# Altium PCB Main-PCB-v1.0.PcbDoc (part 2 of 2)
Units mm, origin at the board's own origin, x right, y up, seen from the top; angles counter-clockwise.
Board outline 33.25 x 52.01 mm, 2 copper layers (Top Layer, Bottom Layer), stack 1.448 mm thick; 71 components, 60 nets, 257 pads, 0 vias.
Unrouted connection lines stored in the file: 158.
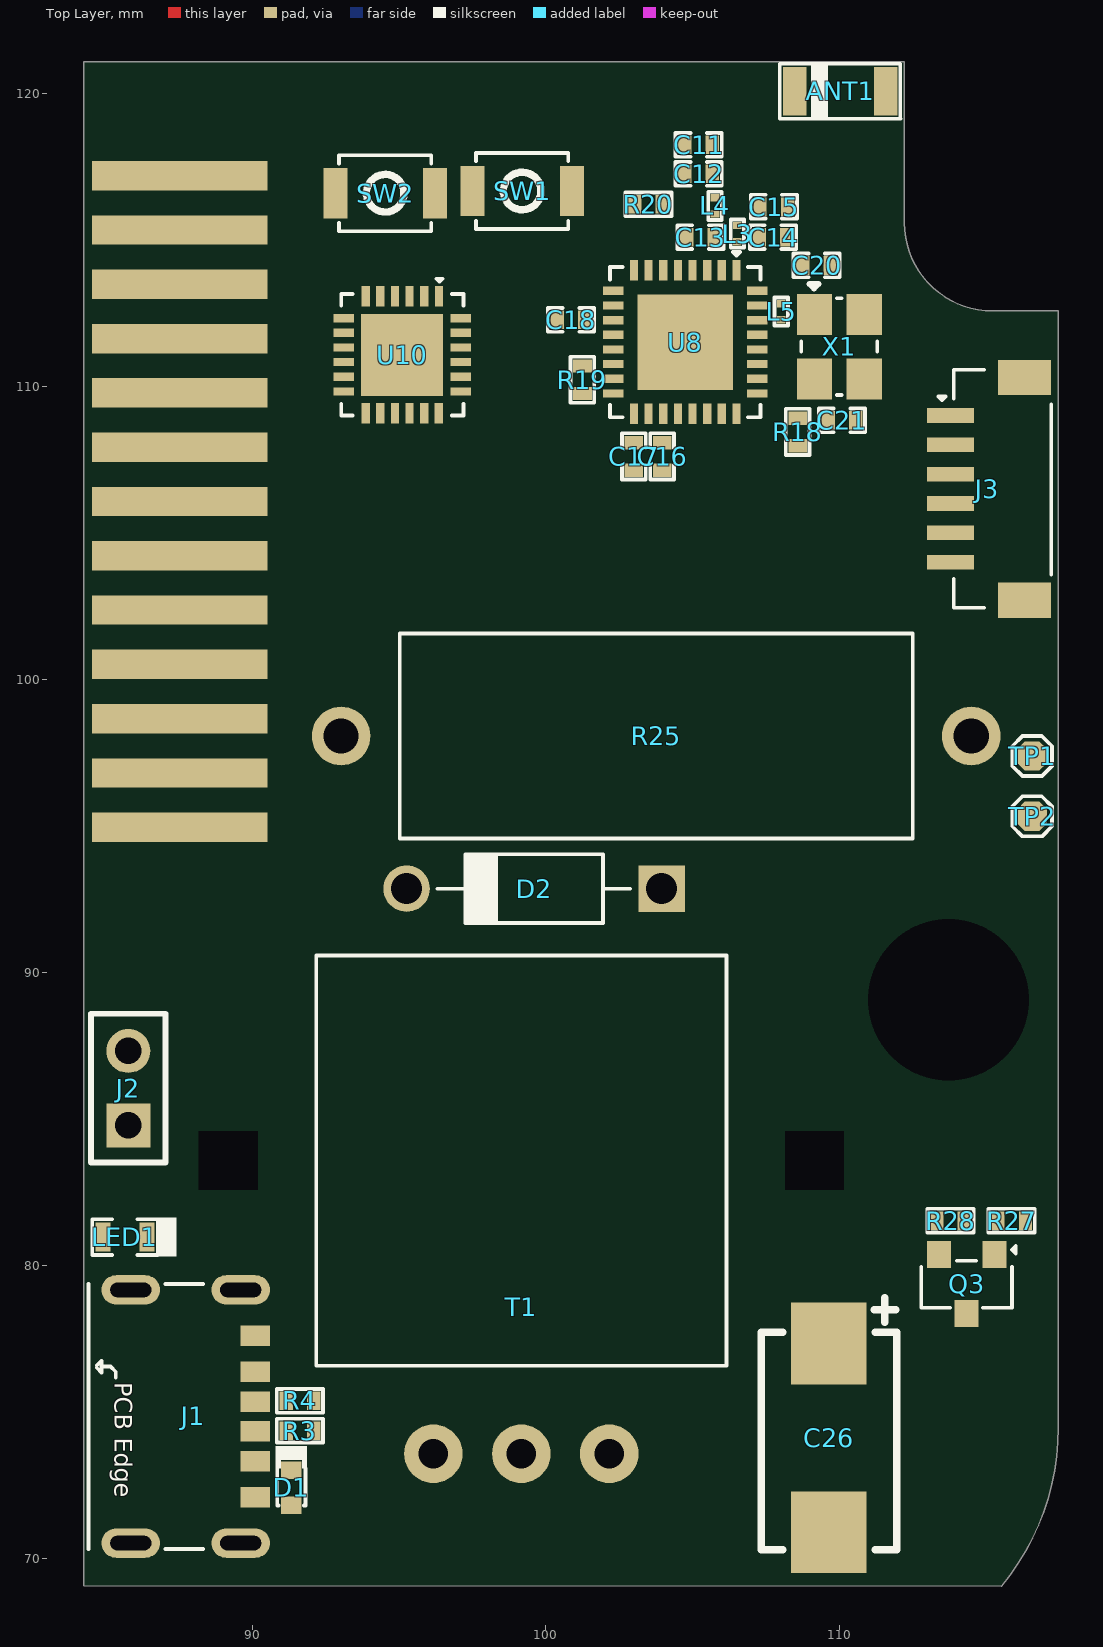
[diagram p0: Top Layer view]

## Part data (continued)
R6: library part RC0603FR-072K2L, "RES 2.2K OHM 1% 1/10W 0603", Case Code (Imperial)=0603, Case Code (Metric)=1608, LCSC Part Number=C114662, Manufacturer=Yageo, Max Operating Temperature=155°C, Max Power Dissipation=100mW, Min Operating Temperature=-55°C, Package Quantity=1, Resistance=2.2kR, Resistance Tolerance=1%, Resistor Type="Thick Film", Temperature Coefficient=100ppm/°C, Voltage Rating=50V, Case/Package=0603, Category="Chip SMD Resistors", Construction=Rectangular, Depth=0.8mm, Features="Moisture Resistant", Height=0.022inch, Item Type=Resistor, Lead Free="Lead Free", Length=1.6mm, Manufacturer Part Number=RC0603FR-072K2L, Military Standard=Not, Number of Terminations=2, Packaging="Tape and Reel", Power Rating=100mW, Pricing 1="5000=0.00133, 10000=0.00131, 20000=0.00127 (USD)", RoHS=Yes, RoHS Compliant=Yes, Series=RC, Size Code=0603, Stock 1=733100, Supplier 1=Avnet, Supplier Part Number 1=RC0603FR-072K2L, Termination=SMD/SMT, Tolerance=1%, Width=0.031inch
R7 R8 R12 R13 R17 R19 R20 R28: library part RC0402FR-0710KL, "RES 10K OHM 1% 1/16W 0402", Case Code (Imperial)=0402, Case Code (Metric)=1005, LCSC Part Number=C60490, Manufacturer=Yageo, Max Operating Temperature=155°C, Max Power Dissipation=63mW, Min Operating Temperature=-55°C, Power Rating=62.5mW, Resistance=10kR, Resistance Tolerance=1%, Resistor Type="Thick Film", Supplier Part Number 1=603-RC0402FR-0710KL, Temperature Coefficient=100ppm/°C, Voltage Rating=50V, Case/Package=0402, Category="Chip SMD Resistors", ComponentLink1Description=https://datasheet.ciiva.com/7660/38568-7660787.pdf?src-supplier=Element14, ComponentLink1URL=https://datasheet.ciiva.com/7660/38568-7660787.pdf?src-supplier=Element14, ComponentLink2Description=https://datasheet.ciiva.com/7849/1686128-7849814.pdf?src-supplier=Element14, ComponentLink2URL=https://datasheet.ciiva.com/7849/1686128-7849814.pdf?src-supplier=Element14, ComponentLink3Description=https://datasheet.ciiva.com/7983/1018594-7983486.pdf?src-supplier=Element14, ComponentLink3URL=https://datasheet.ciiva.com/7983/1018594-7983486.pdf?src-supplier=Element14, ComponentLink4Description=https://datasheet.ciiva.com/22747/1018594-22747512.pdf?src-supplier=Element14, ComponentLink4URL=https://datasheet.ciiva.com/22747/1018594-22747512.pdf?src-supplier=Element14, ComponentLink5Description=https://datasheet.ciiva.com/12667/pyu-rc0402-51-rohs-l-6-r-12667067.pdf?src-supplier=Mouser, ComponentLink5URL=https://datasheet.ciiva.com/12667/pyu-rc0402-51-rohs-l-6-r-12667067.pdf?src-supplier=Mouser, ComponentLink6Description=https://datasheet.ciiva.com/7849/1784430-7849813.pdf?src-supplier=Element14, ComponentLink6URL=https://datasheet.ciiva.com/7849/1784430-7849813.pdf?src-supplier=Element14, ComponentLink7Description=https://datasheet.ciiva.com/7849/1784430-7849815.pdf?src-supplier=Element14, ComponentLink7URL=https://datasheet.ciiva.com/7849/1784430-7849815.pdf?src-supplier=Element14, Construction=Rectangular, Depth=0.5mm, Features="Moisture Resistant", Height=0.32mm, Item Type=Resistor, Lead Free="Lead Free", Lead Pitch=0.2mm, Length=1mm, Manufacturer Part Number=RC0402FR-0710KL, Military Standard=Not, Number of Pins=2, Number of Terminations=2, Packaging="Tape and Reel", Pricing 1="1=0.10000, 10=0.01400, 50=0.01400, 100=0.00500, 1000=0.00300, 10000=0.00200 (USD)", REACH SVHC="No SVHC", RoHS=Yes, RoHS Compliant=Yes, Series=RC, Stock 1=18648329, Supplier 1=Mouser, Termination=SMD/SMT, Tolerance=1%, Voltage Rating (DC)=50V, Width=0.5mm, Working Voltage=50V
R9: library part RC0402FR-07511KL, "RES 511K OHM 1% 1/16W 0402", LCSC Part Number=C163461, Manufacturer=Yageo, Voltage Rating (DC)=50V, ComponentLink1Description=https://datasheet.ciiva.com/8885/pyu-rc0402-51-rohs-l-6-8885432.pdf?src-supplier=Avnet, ComponentLink1URL=https://datasheet.ciiva.com/8885/pyu-rc0402-51-rohs-l-6-8885432.pdf?src-supplier=Avnet, ComponentLink2Description=https://datasheet.ciiva.com/5558/pyu-rc0402-51-rohs-l-6-r-5558143.pdf?src-supplier=Mouser, ComponentLink2URL=https://datasheet.ciiva.com/5558/pyu-rc0402-51-rohs-l-6-r-5558143.pdf?src-supplier=Mouser, Item Type=Resistor, Lead Free=5697LeadFree, Manufacturer Part Number=RC0402FR-07511KL, Pricing="10000=0.0012, 100000=0.0011, 300000=0.001, 750000=0.001, 2000000=0.0009 (USD)", RoHS=Yes, Stock=10000, Supplier="Future Electronics"
R14: library part RT0402BRD0791KL, "RES SMD 91K OHM 0.1% 1/16W 0402", LCSC Part Number=C852952, Manufacturer=Yageo, Supplier Part Number=2018544, Category="Chip SMD Resistors", ComponentLink1Description=https://datasheet.ciiva.com/12723/pyu-rt-1-to-0-05-rohs-l-4-12723861.pdf?src-supplier=Mouser, ComponentLink1URL=https://datasheet.ciiva.com/12723/pyu-rt-1-to-0-05-rohs-l-4-12723861.pdf?src-supplier=Mouser, ComponentLink2Description=https://datasheet.ciiva.com/2582/pyu-rt-1-to-0-05-rohs-l-4-2582528.pdf?src-supplier=Digi-Key, ComponentLink2URL=https://datasheet.ciiva.com/2582/pyu-rt-1-to-0-05-rohs-l-4-2582528.pdf?src-supplier=Digi-Key, ComponentLink3Description=https://datasheet.ciiva.com/46635/pyu-rt-1-to-0-05-rohs-l-5-46635095.pdf?src-supplier=Digi-Key, ComponentLink3URL=https://datasheet.ciiva.com/46635/pyu-rt-1-to-0-05-rohs-l-5-46635095.pdf?src-supplier=Digi-Key, Item Type=Resistor, Manufacturer Part Number=RT0402BRD0791KL, Pricing="10000=0.0178, 20000=0.0174, 40000=0.017, 50000=0.0169, 150000=0.0161 (USD)", RoHS=Yes, Stock=10000, Supplier="Future Electronics"
R18: library part RC0402FR-07499RL, "RES 499 OHM 1% 1/16W 0402", Case Code (Imperial)=0402, Case Code (Metric)=1005, LCSC Part Number=C137970, Manufacturer=Yageo, Max Operating Temperature=155°C, Max Power Dissipation=63mW, Min Operating Temperature=-55°C, Package Quantity=1, Power Rating=62.5mW, Resistance Tolerance=1%, Resistor Type="Thick Film", Supplier Part Number 1=603-RC0402FR-07499RL, Temperature Coefficient=100ppm/°C, Voltage Rating=50V, Case/Package=0402, Category="Chip SMD Resistors", ComponentLink1Description=https://datasheet.ciiva.com/2453/pyu-r-int-thick-7-2453539.pdf?src-supplier=Digi-Key, ComponentLink1URL=https://datasheet.ciiva.com/2453/pyu-r-int-thick-7-2453539.pdf?src-supplier=Digi-Key, ComponentLink2Description=https://datasheet.ciiva.com/2453/pyu-r-int-thick-7-2453540.pdf?src-supplier=Digi-Key, ComponentLink2URL=https://datasheet.ciiva.com/2453/pyu-r-int-thick-7-2453540.pdf?src-supplier=Digi-Key, ComponentLink3Description=https://datasheet.ciiva.com/2453/pyu-r-int-thick-7-2453538.pdf?src-supplier=Digi-Key, ComponentLink3URL=https://datasheet.ciiva.com/2453/pyu-r-int-thick-7-2453538.pdf?src-supplier=Digi-Key, Construction=Rectangular, Depth=0.5mm, Features="Moisture Resistant", Height=0.016inch, Lead Free="Lead Free", Length=1mm, Manufacturer Part Number=RC0402FR-07499RL, Military Standard=Not, Number of Terminations=2, Packaging="Tape and Reel", Pricing 1="1=0.10000, 10=0.01200, 50=0.01200, 100=0.00500, 1000=0.00300, 10000=0.00100 (USD)", REACH SVHC="No SVHC", Resistance=499R, RoHS=Yes, RoHS Compliant=Yes, Series=RC, Size Code=0402, Stock 1=936879, Supplier 1=Mouser, Termination=SMD/SMT, Tolerance=1%, Voltage Rating (DC)=50V, Width=0.02inch
R25: library part MFR03SF330JA10, "Metal Film Resistors 33Ω 3W ±50ppm/℃ ±1% Plugin,D5xL15.5mm Through Hole Resistors ROHS", LCSC Part Number=C58749, Manufacturer=UNI-ROYAL, Package=Plugin,D5xL15.5mm, ComponentLink1Description=LCSC, ComponentLink1URL=https://www.lcsc.com/product-detail/Through-Hole-Resistors_UNI-ROYAL-Uniroyal-Elec-MFR03SF330JA10_C58749.html, Item Type=Resistor, Manufacturer Part Number=MFR03SF330JA10
R27: library part RC0402FR-07680RL, "RES 680 OHM 1% 1/16W 0402", Case Code (Imperial)=0402, Case Code (Metric)=1005, Manufacturer=Yageo, Max Operating Temperature=155°C, Max Power Dissipation=63mW, Min Operating Temperature=-55°C, Resistance Tolerance=1%, Resistor Type="Thick Film", Supplier Part Number 1=7948052, Temperature Coefficient=100ppm/°C, Voltage Rating=50V, Case/Package=0402, Category="Chip SMD Resistors", ComponentLink1Description=https://datasheet.ciiva.com/12667/pyu-rc0402-51-rohs-l-6-r-12667916.pdf?src-supplier=Mouser, ComponentLink1URL=https://datasheet.ciiva.com/12667/pyu-rc0402-51-rohs-l-6-r-12667916.pdf?src-supplier=Mouser, ComponentLink2Description=https://datasheet.ciiva.com/7850/1018594-7850071.pdf?src-supplier=Element14, ComponentLink2URL=https://datasheet.ciiva.com/7850/1018594-7850071.pdf?src-supplier=Element14, ComponentLink3Description=https://datasheet.ciiva.com/7850/1018594-7850070.pdf?src-supplier=Element14, ComponentLink3URL=https://datasheet.ciiva.com/7850/1018594-7850070.pdf?src-supplier=Element14, ComponentLink4Description=https://datasheet.ciiva.com/17042/pyu-rc0402-51-rohs-l-6-r-17042399.pdf?src-supplier=Future+Electronics, ComponentLink4URL=https://datasheet.ciiva.com/17042/pyu-rc0402-51-rohs-l-6-r-17042399.pdf?src-supplier=Future+Electronics, Construction=Rectangular, Depth=0.5mm, Features="Moisture Resistant", Item Type=Resistor, Lead Free="Lead Free", Length=1mm, Manufacturer Part Number=RC0402FR-07680RL, Military Standard=Not, Number of Terminations=2, Packaging="Tape and Reel", Power Rating=63mW, Pricing 1="10000=0.0011, 100000=0.0011, 300000=0.001, 750000=0.001, 2000000=0.0009 (USD)", Reach SVHC Compliant=No, Resistance=680R, RoHS=Yes, RoHS Compliant=Yes, Series=RC, Size Code=0402, Stock 1=5080000, Supplier 1="Future Electronics", Termination=SMD/SMT, Tolerance=1%, Voltage Rating (AC)=50V
SW1 SW2: "SWITCH TACTILE SPST-NO 0.05A 12V", Contact Current Rating=50mA, Contact Resistance=100mR, Insulation Resistance=100MR, LCSC Part Number=C231329, Manufacturer=Omron, Max Operating Temperature=70°C, Max Voltage Rating (DC)=12V, Min Operating Temperature=-25°C, Operating Force=1.5N, Package Quantity=1, Ratings="Dust Proof,IP40", Supplier Part Number 1=SW1020DKR-ND, Actuator Length=0.4mm, Actuator Type=Standard, ComponentLink1Description=http://www.farnell.com/datasheets/60838.pdf?src-supplier=Farnell, ComponentLink1URL=http://www.farnell.com/datasheets/60838.pdf?src-supplier=Farnell, ComponentLink2Description=http://www.farnell.com/datasheets/60838.pdf?src-supplier=Element14, ComponentLink2URL=http://www.farnell.com/datasheets/60838.pdf?src-supplier=Element14, ComponentLink3Description=https://omronfs.omron.com/en_US/ecb/products/pdf/en-b3u.pdf?src-supplier=Digi-Key, ComponentLink3URL=https://omronfs.omron.com/en_US/ecb/products/pdf/en-b3u.pdf?src-supplier=Digi-Key, ComponentLink4Description=http://www.omron.com/ecb/products/pdf/en-b3u.pdf?src-supplier=Digi-Key, ComponentLink4URL=http://www.omron.com/ecb/products/pdf/en-b3u.pdf?src-supplier=Digi-Key, ComponentLink5Description=https://www.distrelec.biz/Web/Downloads/he/et/B3U_eng_datasheet.pdf?mime=application%2Fpdf&src-supplier=Distrelec, ComponentLink5URL=https://www.distrelec.biz/Web/Downloads/he/et/B3U_eng_datasheet.pdf?mime=application%2Fpdf&src-supplier=Distrelec, ComponentLink6Description=http://www.onlinecomponents.com/productFiles/mf-OM/en-b3u.pdf?src-supplier=Onlinecomponents.com, ComponentLink6URL=http://www.onlinecomponents.com/productFiles/mf-OM/en-b3u.pdf?src-supplier=Onlinecomponents.com, ComponentLink7Description=https://www.verical.com/server-webapp/html/getDatasheet?partID=552554&src-supplier=Verical, ComponentLink7URL=https://www.verical.com/server-webapp/html/getDatasheet?partID=552554&src-supplier=Verical, ComponentLink8Description=http://www.farnell.com/datasheets/1685550.pdf?src-supplier=Element14, ComponentLink8URL=http://www.farnell.com/datasheets/1685550.pdf?src-supplier=Element14, ComponentLink9Description=http://www.farnell.com/datasheets/2610940.pdf?src-supplier=Farnell, ComponentLink9URL=http://www.farnell.com/datasheets/2610940.pdf?src-supplier=Farnell, ComponentLink10Description=https://www.alliedelec.com/m/d/4c8a9ef82804fc3c241a13c1e298fd73.pdf?src-supplier=Allied+Electronics, ComponentLink10URL=https://www.alliedelec.com/m/d/4c8a9ef82804fc3c241a13c1e298fd73.pdf?src-supplier=Allied+Electronics, Contact Material=Silver, Current Rating=50mA, Depth=2.5mm, Electrical Life=200000Cycles, Height=1.2mm, Illumination Type=Non-Illuminated,Illuminated, Item Type=Switch, Lead Free="Lead Free", Length=4mm, Manufacturer Part Number=B3U-1000P, Max Current Rating=50mA, Mechanical Life=200000Cycles, Mount="Surface Mount", Orientation=Straight, Packaging="Tape and Reel", Pricing 1="1=1, 10=0.961, 25=0.9064, 50=0.7976, 100=0.7251, 250=0.68888, 500=0.67074, 1000=0.52571 (USD)", REACH SVHC=Unknown, Stock 1=116454, Supplier 1=Digi-Key, Switch Function=Off-Mom, Switch Travel=0.15mm, Termination=SMD/SMT, Throw Configuration=SPST, Voltage Rating (DC)=12V, Weight=0.000776oz, Width=3mm
T1: "15KV Arc Ignition High Voltage Inverter Step Up Boost Coil Transformer Pulse Ignition 1.4x1.4x0.7cm Lighter Accessories", Manufacturer=Aideepen, ComponentLink1Description=Aliexpress, ComponentLink1URL=https://vi.aliexpress.com/item/1005006061113490.html, Item Type=Transformer, Manufacturer Part Number="15KV step-up coil transformer"
TP1 TP2: "Test Point ON", Item Type="Test Point", Manufacturer Part Number="TEST POINT 0.5mm Dia"
U1: "SOT-23-6 Battery Management ROHS", LCSC Part Number=C18186335, Manufacturer="Shenzhen Fuman Elec", Package=SOT-23-6, ComponentLink1Description=LCSC, ComponentLink1URL=https://www.lcsc.com/product-detail/Battery-Management_Shenzhen-Fuman-Elec-DW01-A-J_C18186335.html, Item Type=IC, Manufacturer Part Number=DW01-A/J
U2: "4.5V~5.5V 锂离子/Polymer 1 600mA SOT-23-5 Battery Management ICs ROHS", LCSC Part Number=C382138, Manufacturer=TPOWER, Package=SOT-23-5, ComponentLink1Description=LCSC, ComponentLink1URL=https://www.lcsc.com/product-detail/Battery-Management-ICs_TPOWER-TP4054_C382138.html, Item Type=IC, Manufacturer Part Number=TP4054
U3: "Active Low 1 VSOF-5 Monitors & Reset Circuits ROHS", Case/Package=VSOF, LCSC Part Number=C2067200, Manufacturer=Rohm, Max Operating Temperature=105°C, Max Power Dissipation=210mW, Max Reset Threshold Voltage=6.09V, Max Supply Current=1.98uA, Max Supply Voltage=10V, Min Operating Temperature=-40°C, Min Reset Threshold Voltage=5.91V, Min Supply Voltage=1.2V, Number of Voltages Monitored=1, Operating Supply Current=900nA, Package Quantity=3000, Supplier Part Number 1=1717448, Threshold Voltage=6V, Accuracy=1%, Category="Voltage Supervisors", ComponentLink1Description=https://datasheet.ciiva.com/1974/bd48xxg-e-1974994.pdf?src-supplier=Digi-Key, ComponentLink1URL=https://datasheet.ciiva.com/1974/bd48xxg-e-1974994.pdf?src-supplier=Digi-Key, ComponentLink2Description=https://datasheet.ciiva.com/8133/bd48xxg-e-8133113.pdf?src-supplier=Avnet, ComponentLink2URL=https://datasheet.ciiva.com/8133/bd48xxg-e-8133113.pdf?src-supplier=Avnet, ComponentLink3Description=LCSC, ComponentLink3URL=https://www.lcsc.com/product-detail/Monitors-Reset-Circuits_ROHM-Semicon-BD4830FVE-TR_C2067200.html, Item Type=IC, Lead Free="Lead Free", Manufacturer Part Number=BD4830FVE-TR, Mounting Technology="Surface Mount", Number of Monitored Inputs=1, Packaging="Tape and Reel", Pins=5, Pricing 1="1=0.64000, 10=0.54900, 25=0.51200, 100=0.40960, 250=0.38032, 500=0.32182, 1000=0.24868 (USD)", Reset="Active Low", RoHS=Yes, RoHS Compliant=Yes, Series=BD48xxx, Stock 1=5990, Supplier 1=Rs, Type="Simple Reset/Power-On Reset,Voltage Detector", Watchdog Timer=No
U4: "20V 6A 22mΩ@4.5V,4.5A 2W 2PCSNChannel(Common Drain) SOT-23-6 MOSFETs ROHS", LCSC Part Number=C841290, Manufacturer="Shenzhen Fuman Elec", Package=SOT-23-6, ComponentLink1Description=LCSC, ComponentLink1URL=https://www.lcsc.com/product-detail/MOSFETs_Shenzhen-Fuman-Elec-8205A_C841290.html, Item Type=IC, Manufacturer Part Number=.8205A
U5: "Non-Isolated PoL Module DC DC Converter 1 Output 1.2 ~ 5.3V 2A 1.6V - 5.5V Input", LCSC Part Number=C5219190, Manufacturer="Texas Instruments", Height=600um, Item Type=IC, Length=2.1mm, Manufacturer Part Number=TPS631000DRLR, Pins=8NUMBER, Pricing="1=1.49, 10=1.34, 50=1.34, 100=1.08, 1000=0.733, 10000=0.631 (USD)", RoHS=No, Stock=19488, Supplier=Mouser, Thickness=550um, Topology=6153TopologyType, Width=1.2mm
U7: "IC BATT MON LI-ION 1CELL 8TDFN", LCSC Part Number=C2682616, Manufacturer=Maxim, Max Operating Temperature=85°C, Min Operating Temperature=-20°C, Operating Supply Current=23uA, Operating Supply Voltage=4.5V, Output Voltage=400mV, Package Quantity=10000, Supplier Part Number 1=700-MAX17048G+T10, Category="Battery Management", ComponentLink1Description=https://datasheet.ciiva.com/14083/max17048-max17049-14083973.pdf?src-supplier=Digi-Key, ComponentLink1URL=https://datasheet.ciiva.com/14083/max17048-max17049-14083973.pdf?src-supplier=Digi-Key, Contact Plating=Tin,Matte, Item Type=IC, Manufacturer Part Number=MAX17048G+T10, Mount="Surface Mount", Number of Pins=8, Packaging="Tape and Reel", Pricing 1="1=3.34000, 10=3.00000, 50=2.84000, 100=2.46000, 1000=1.89000, 10000=1.83000 (USD)", Radiation Hardening=No, RoHS=Yes, RoHS Compliant=Yes, Series=ModelGauge™, Stock 1=41293, Supplier 1=Mouser
U8: "RF TXRX MODULE BLUETOOTH SMD", LCSC Part Number=C2858491, Manufacturer="Espressif Systems", Supplier Part Number=1904-ESP32-C3FH4CT-ND, Category=Uncategorized, Item Type=IC, Manufacturer Part Number=ESP32-C3FH4, Pricing="1=1.3 (USD)", RoHS=No, Stock=7160, Supplier=Digikey
U10: "16 400kHz I2C TQFN-24-EP(4x4) I/O Expanders ROHS", LCSC Part Number=C148077, Manufacturer=AWINIC, Package=TQFN-24-EP(4x4), ComponentLink1Description=LCSC, ComponentLink1URL=https://www.lcsc.com/product-detail/I-O-Expanders_AWINIC-Shanghai-Awinic-Tech-AW9523BTQR_C148077.html, Item Type=IC, Manufacturer Part Number=AW9523BTQR
X1: library part X322540MPB4SI, "40MHz SMD Crystal Resonator 15pF SMD3225-4P Crystals ROHS", LCSC Part Number=C9010, Manufacturer="Yangxing Tech", ComponentLink1Description=LCSC, ComponentLink1URL=https://www.lcsc.com/product-detail/Crystals_Yangxing-Tech-X322540MPB4SI_C9010.html, Item Type=Crystal, Manufacturer Part Number=X322540MPB4SI

## Free pads (board coordinates)
  rect 6x1 smd: 1(87.507,96.81) 1(87.507,98.662) 1(87.507,100.514) 1(87.507,102.366) 1(87.507,104.218) 1(87.507,106.07) 1(87.507,107.922) 1(87.507,109.774) 1(87.507,111.626) 1(87.507,113.478) 1(87.507,115.33) 13(87.507,94.958) 13(87.507,117.183)
  round 0 hole 5.5: 16(113.73,89.071)

## Nets (pads, with @x,y where several pads share a name; then routed paths per layer and width w, separated by ;. In a path a pad name is that pad's centre, name@x,y a point inside that pad or via, vN(x,y) a via of type N, cw(c..) or ccw(c..) an arc to the next point about the centre after c; other vN are vias at no path point)
3V3: C5.2 C6.2 C11.2 C12.2 C14.2 C15.1 C16.1 C17.2 C18.2 C27.1 J3.1 L4.1 R7.1 R9.2 R17.1 R19.1 R20.1 R23.2 R24.2 R35.2 U5.1 U8.11 U8.17 U8.18 U8.31 U8.32 U10.18 U10.21 U10.24
3V3_EN: R8.2 U3.1 U5.5
ARC_IGNITER: R27.1 U8.10
BAT_ALERT: R7.2 U7.5
BATT: C3.2 C4.2 C26.1 J2.1 R2.2 R8.1 R26.1 T1.2 U2.3 U3.5 U5.4 U7.2 U7.3
ESP_EN: C10.1 J3.6 R17.2 SW1.2 U8.7
GND: C1.1 C3.1 C4.1 C5.1 C6.1 C10.2 C11.1 C12.1 C13.1 C14.1 C15.2 C16.2 C17.1 C18.1 C19.2 C20.1 C21.1 C26.2 C27.2 D1.1 J1.A12 J1.B12 J3.2 pad.1@87.507,102.366 Q2.3 Q3.2 R3.1 R4.1 R5.1 R6.1 R12.1 R13.2 R14.1 R28.1 SW1.1 SW2.1 U2.2 U3.2 U3.4 U4.3 U5.7 U7.1 U7.4 U7.9 U8.33 U10.9 U10.25 X1.2 X1.4
I2C_SCL: R24.1 U7.7 U8.13 U10.19
I2C_SDA: R23.1 U7.8 U8.12 U10.20
IO2: R20.2 U8.6
IO8: R19.2 U8.14
IO9: C19.1 J3.5 SW2.2 U8.15
LED1: U10.5
LED2: U10.6
LED3: U10.7
LED4: U10.8
LED5: U10.10
LED6: U10.11
LED7: U10.12
LED8: U10.13
LED9: U10.1
LED10: U10.2
LED_RST: R35.1 U10.23
NetANT1_1: ANT1.1 L3.1
NetC2_1: C2.1 U1.6
NetC2_2: C2.2 R2.1 U1.5
NetC13_2: C13.2 L4.2 U8.2 U8.3
NetC20_2: C20.2 L5.1 X1.1
NetC21_2: C21.2 U8.29 X1.3
NetD2_1: D2.1 T1.3
NetD2_2: D2.2 R25.1
NetJ1_A5: J1.A5 R3.2
NetJ1_B5: J1.B5 R4.2
NetJ2_2: J2.2 U4.1
NetL1_1: L1.1 U5.2
NetL1_2: L1.2 U5.3
NetL3_2: L3.2 U8.1
NetL5_2: L5.2 U8.30
NetLED1_1: LED1.1 R1.1
NetLED1_2: LED1.2 U2.1
NetQ1_1: pad.1@87.507,104.218 pad.1@87.507,106.07 Q1.1 Q3.3 R26.2
NetQ1_2: Q1.2 R25.2
NetQ1_3: Q1.3 Q2.1
NetQ2_2: Q2.2 T1.1
NetQ3_1: Q3.1 R27.2 R28.2
NetR5_2: R5.2 U2.5
NetR6_2: R6.2 U1.2
NetR9_1: R9.1 R14.2 U5.8
NetR12_2: R12.2 U7.6
NetR13_1: R13.1 U5.6
NetR18_1: R18.1 U8.28
NetU1_1: U1.1 U4.6
NetU1_3: U1.3 U4.4
NetU4_2: U4.2 U4.5
RXD0: J3.4 U8.27
TOUCH_SIG: U8.9
TXD0: J3.3 R18.2
USB_D_N: TP2.1 U8.25
USB_D_P: TP1.1 U8.26
VBUS: C1.2 D1.2 J1.A9 J1.B9 R1.2 U2.4
pads on no net: ANT1.2 J1.MH1 J1.MH2 J1.MH3 J1.MH4 J3.MP1 J3.MP2 T1.4 U1.4 U3.3 U8.4 U8.5 U8.8 U8.16 U8.19 U8.20 U8.21 U8.22 U8.23 U8.24 U10.3 U10.4 U10.14 U10.15 U10.16 U10.17 U10.22

## Silkscreen, mask and mechanical layers (free items; w line width, h text height)
Mechanical 1:
  circle w0.013: c113.73,89.071 r2.1
  circle w0.013: c113.73,89.071 r2.75
  circle w0.013: c113.73,89.071 r1
  circle w0.013: c113.73,89.071 r2
  lines w0.013: 108.48,89.071 108.73,89.071 ; 111.23,89.071 113.73,89.071 ; 111.349,87.696 116.112,90.446 ; 111.912,90.121 115.549,88.021 ; 113.73,83.821 113.73,84.071 ; 113.73,86.571 113.73,89.071 ; 113.73,91.571 113.73,89.071 ; 113.73,94.071 113.73,94.321 ; 116.23,89.071 113.73,89.071
Dimension:
  lines w0.254: 115.539,69.062 ccw(c108.98,74.469) 117.48,74.469 117.48,112.571 115.23,112.571 cw(c115.23,115.571) 112.23,115.571 112.23,121.071 84.23,121.071 84.23,69.071 115.539,69.07
Mechanical 15:
  lines w0.254: 84.23,91.071 84.23,121.071 91.165,121.071

## Text inside footprints (layer, text, board x,y; h text height)
J1: Top Overlay "PCB Edge" at 85.081,76.025 h1.02 r270